# Altium PCB EMG-Arm-ELEC-V2.0.PcbDoc (part 4 of 5)
Units mil, origin at the board's own origin, x right, y up, seen from the top; angles counter-clockwise.
Board outline 8303.83 x 7532.25 mil, 2 copper layers (Top Layer, Bottom Layer), stack 3.556 mil thick; 263 components, 174 nets, 696 pads, 313 vias.
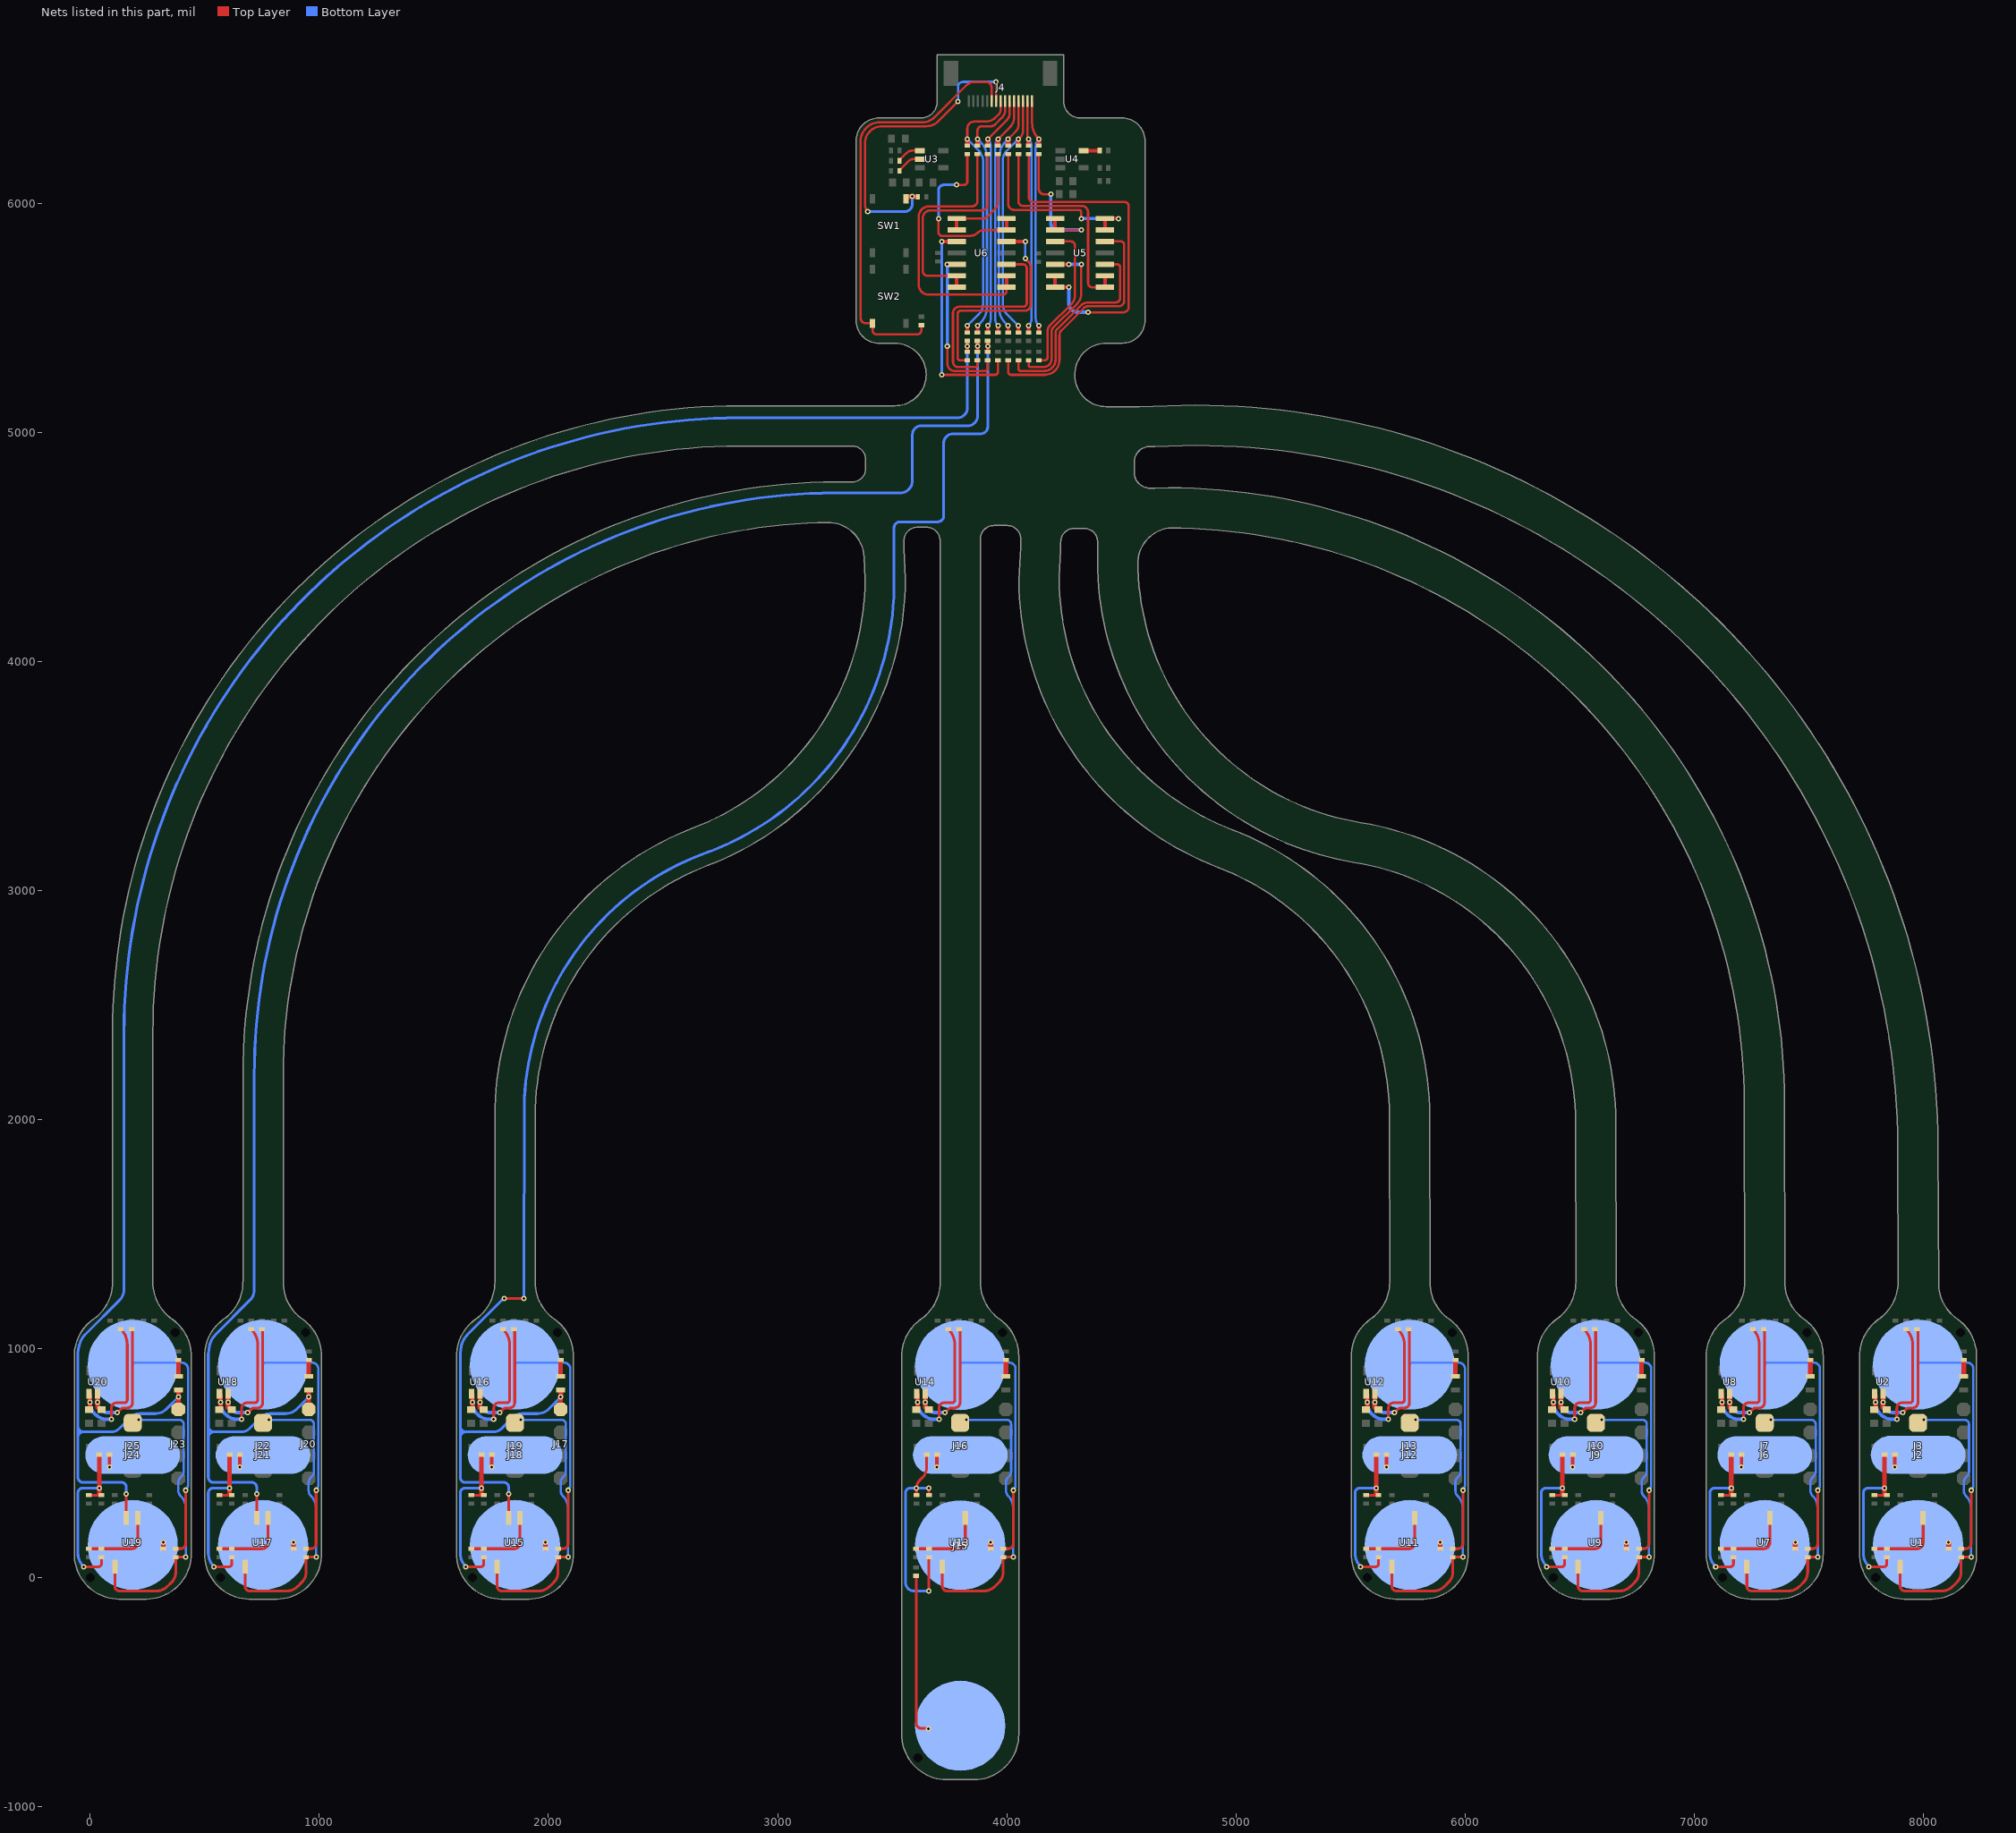
[diagram p3: the nets of this part, all layers, seen from the top]

## Via types
v1: diameter 23.62, hole 11.81, Top Layer to Bottom Layer, tented both sides, 313 vias

## Nets (pads, with @x,y where several pads share a name; then routed paths per layer and width w, separated by ;. In a path a pad name is that pad's centre, name@x,y a point inside that pad or via, vN(x,y) a via of type N, cw(c..) or ccw(c..) an arc to the next point about the centre after c; other vN are vias at no path point) (continued)
Measure6: J17.1 LED6.1 SB6.1 SB25.1 U15.7 | length 7222.4
  Top Layer w12: v1@1803.14,1218.15 v1(1806,1218.15) v1(1893.07,1218.15) ; U15.7@1825.8,259.35 v1(1825.8,365.14) ; J17.1@2052.95,733.06 J17.1@2053.28,733.38 ; LED6.1@2052.96,818.52 LED6.1@2053.61,817.87 ; v1@2053.28,788.06 v1(2053.61,788.39)
  Top Layer w15: SB25.1@3917.35,5351.05 v1(3917.35,5375.05) SB6.1@3917.35,5399.05
  Top Layer w20: J17.1@2053.28,733.38 v1@2053.28,788.06 ; v1(2053.61,788.39) LED6.1@2053.61,817.87
  Bottom Layer w12: 1619.24,635.65 1637.12,635.65 ; 1649.61,1063.73 ccw(c1735.53,977.86) 1627.27,1032.95 ccw(c1735.53,977.86) 1626.93,1032.27 1621.9,1018.41 1616.99,997.3 1614.77,976.87 1614.77,660.12 ; 1649.64,1063.75 v1@1805.02,1219.14 ; 1793.65,649.24 cw(c1760.8,682.15) 1760.8,635.65 1637.12,635.65 ; 1793.68,649.27 1842.73,698.32 cw(c1883.45,657.6) 1883.45,715.19 1908.44,715.19 1952.23,715.19 1952.3,715.19 ccw(c1952.24,783.2) 2000.36,735.14 v1(2053.61,788.39) ; v1(1825.8,365.14) 1825.8,394.68 ccw(c1805.71,394.68) 1805.71,414.77 1637.33,414.77 cw(c1637.33,437.33) 1614.77,437.33 1614.77,610.98 ; v1(1893.07,1218.15) 1893.07,1336.76 1893.82,2015.83 cw(c3098.17,2031.47) 2705.5,3170.11 ; 2705.5,3170.11 ccw(c2257.62,4337.95) 3508.28,4354.96 3508.28,4582.98 cw(c3534.14,4582.98) 3534.14,4608.84 3698.86,4608.84 ccw(c3698.86,4635.08) 3725.1,4635.08 3725.1,4952.9 cw(c3765.25,4952.9) 3765.25,4993.05 3886,4993.05 ccw(c3886,5024.39) 3917.35,5024.39 v1(3917.35,5375.05) ; 1614.77,610.98 cw(c1639.34,610.98) 1639.34,635.55 cw(c1639.34,660.12) 1637.12,635.65 ; 1614.77,610.98 1614.77,660.12 ; 1614.77,660.12 ccw(c1639.34,660.12) 1637.12,635.65
Measure7: J20.1 LED7.1 SB7.1 SB26.1 U17.7 | length 8094.8
  Top Layer w12: U17.7@726.01,259.35 v1(726.01,365.14) ; J20.1@953.17,733.06 J20.1@953.5,733.38 ; LED7.1@953.17,818.52 LED7.1@953.83,817.87 ; v1@953.5,788.06 v1(953.83,788.39)
  Top Layer w15: SB26.1@3872.74,5351.05 v1(3872.74,5375.05) SB7.1@3872.74,5399.05
  Top Layer w20: J20.1@953.5,733.38 v1@953.5,788.06 ; v1(953.83,788.39) LED7.1@953.83,817.87
  Bottom Layer w12: 519.45,635.65 537.34,635.65 ; 693.87,649.24 cw(c661.01,682.15) 661.01,635.65 537.34,635.65 ; 693.89,649.27 742.95,698.32 ; v1(726.01,365.14) 726.01,394.68 ccw(c705.93,394.68) 705.93,414.77 537.55,414.77 cw(c537.55,437.33) 514.98,437.33 514.98,610.98 ; 742.98,698.35 cw(c783.67,657.6) 783.67,715.19 808.66,715.19 852.45,715.19 852.52,715.19 ccw(c852.45,783.2) 900.58,735.14 v1(953.83,788.39) ; v1(3872.74,5375.05) 3872.74,5071.49 cw(c3829.02,5071.49) 3829.02,5027.78 3626.06,5027.78 ccw(c3626.06,4990.23) 3588.51,4990.23 3588.51,4789.01 cw(c3534.43,4789.01) 3534.43,4734.94 3249.14,4734.94 ccw(c3252.93,2197.73) 715.73,2193.94 715.73,1256.49 cw(c650.88,1256.49) 696.73,1210.63 549.85,1063.75 ccw(c635.75,977.86) 527.48,1032.95 ccw(c635.75,977.86) 527.14,1032.27 522.11,1018.41 517.21,997.3 514.98,976.87 514.98,660.12 ; 514.98,610.98 cw(c539.55,610.98) 539.55,635.55 cw(c539.55,660.12) 537.34,635.65 ; 514.98,610.98 514.98,660.12 ; 514.98,660.12 ccw(c539.55,660.12) 537.34,635.65
Measure8: J23.1 LED8.1 SB8.1 SB27.1 U19.7 | length 8594.9
  Top Layer w12: U19.7@157.04,259.35 v1(157.04,365.14) ; J23.1@384.2,733.06 J23.1@384.52,733.38 ; LED8.1@384.2,818.52 LED8.1@384.85,817.87 ; v1@384.52,788.06 v1(384.85,788.39)
  Top Layer w15: SB27.1@3828.13,5351.05 v1(3828.13,5375.05) SB8.1@3828.13,5399.05
  Top Layer w20: J23.1@384.52,733.38 v1@384.52,788.06 ; v1(384.85,788.39) LED8.1@384.85,817.87
  Bottom Layer w12: -49.52,635.65 -31.64,635.65 ; 124.89,649.24 cw(c92.04,682.15) 92.04,635.65 -31.64,635.65 ; 124.92,649.27 173.97,698.32 ; v1(157.04,365.14) 157.04,394.68 ccw(c136.95,394.68) 136.95,414.77 -31.43,414.77 cw(c-31.43,437.33) -53.99,437.33 -53.99,610.98 ; 174.01,698.35 cw(c214.69,657.6) 214.69,715.19 239.68,715.19 283.47,715.19 283.54,715.19 ccw(c283.48,783.2) 331.6,735.14 v1(384.85,788.39) ; v1(3828.13,5375.05) 3828.13,5105.91 cw(c3785.16,5105.91) 3785.16,5062.94 2834.14,5062.94 ccw(c2832.63,2377.32) 147.02,2378.83 147.02,1257.13 cw(c81.26,1257.13) 130.71,1213.79 cw(c81.26,1257.13) 127.92,1210.8 cw(c81.26,1257.13) 127.76,1210.63 -19.12,1063.75 ccw(c66.77,977.86) -41.49,1032.95 ccw(c66.77,977.86) -41.83,1032.27 -46.86,1018.41 -51.77,997.3 -53.99,976.87 -53.99,660.12 ; -53.99,610.98 cw(c-29.42,610.98) -29.42,635.55 cw(c-29.42,660.12) -31.64,635.65 ; -53.99,610.98 -53.99,660.12 ; -53.99,660.12 ccw(c-29.42,660.12) -31.64,635.65
MID1: J3.3 SB105.1 U1.1 | length 1345.7
  Top Layer w12: U1.1@7900.38,46.75 7900.38,-39.36 ccw(c7919.77,-39.36) 7919.77,-58.75 8083.09,-58.75 ccw(c8083.09,7.14) 8129.66,-39.48 ; J3.3@7978.35,675 ccw(c7980.29,675) J3.3@7980.29,673.05 ; 8129.69,-39.45 8147.87,-21.26 ccw(c8103.97,22.64) 8166.06,22.64 SB105.1@8166.06,88.17 8166.78,88.89 8209.28,88.89 v1(8210,89.61)
  Top Layer w20: J3.3@7980.29,673.05 8004.15,673.05 J3.3@8004.3,672.89
  Bottom Layer w10: v1@8004.46,688.05 8181.85,688.05 cw(c8181.85,669.26) 8200.63,669.26 8200.63,460.42 cw(c8176.65,460.42) 8193.61,443.47 8186.92,436.78 ccw(c8209.58,414.13) 8177.54,414.13 8177.54,380.09 8177.54,380.02 ccw(c8212.46,380.02) 8187.77,355.33 8187.81,355.29 8193.61,349.49 cw(c8125.95,299.63) 8210,299.63 v1(8210,89.61)
  other v1: 8004.3,687.89
MID2: J7.3 SB205.1 U7.1 | length 1345.7
  Top Layer w12: U7.1@7230.91,46.75 7230.91,-39.36 ccw(c7250.3,-39.36) 7250.3,-58.75 7413.62,-58.75 ccw(c7413.62,7.14) 7460.18,-39.48 7478.4,-21.26 ccw(c7434.49,22.64) 7496.59,22.64 SB205.1@7496.59,88.17 7497.31,88.89 7539.8,88.89 v1(7540.52,89.61) ; J7.3@7308.87,675 ccw(c7310.82,675) J7.3@7310.82,673.05
  Top Layer w20: J7.3@7310.82,673.05 7334.67,673.05 J7.3@7334.83,672.89
  Bottom Layer w10: v1@7334.99,688.05 7512.37,688.05 cw(c7512.37,669.26) 7531.16,669.26 7531.16,460.43 cw(c7507.18,460.43) 7524.14,443.47 7517.45,436.78 ccw(c7540.11,414.13) 7508.07,414.13 7508.07,380.1 7508.07,380.03 ccw(c7542.98,380.03) 7518.29,355.33 7518.34,355.29 7524.14,349.49 cw(c7456.47,299.63) 7540.52,299.63 v1(7540.52,89.61)
  other v1: 7334.83,687.89
MID3: J10.3 SB305.1 U9.1 | length 1345.7
  Top Layer w12: U9.1@6494.16,46.75 6494.16,-39.36 ccw(c6513.55,-39.36) 6513.55,-58.76 6676.87,-58.76 ccw(c6676.87,7.14) 6723.43,-39.49 ; J10.3@6572.12,675 ccw(c6574.07,674.99) J10.3@6574.07,673.04 ; 6723.46,-39.46 6741.65,-21.27 ccw(c6697.75,22.64) 6759.84,22.64 SB305.1@6759.84,88.16 6760.56,88.89 6803.05,88.89 v1(6803.78,89.61)
  Top Layer w20: J10.3@6574.07,673.04 6597.92,673.04 J10.3@6598.08,672.89
  Bottom Layer w10: v1@6598.24,688.04 6775.62,688.04 cw(c6775.62,669.26) 6794.41,669.26 6794.41,460.42 cw(c6770.43,460.42) 6787.39,443.46 6780.7,436.78 ccw(c6803.36,414.12) 6771.32,414.12 6771.32,380.09 6771.32,380.02 ccw(c6806.23,380.02) 6781.54,355.33 6781.59,355.28 6787.39,349.48 cw(c6719.73,299.62) 6803.78,299.62 v1(6803.78,89.61)
  other v1: 6598.08,687.89
MID4: J13.3 SB405.1 U11.1 | length 1345.7
  Top Layer w12: U11.1@5681.44,46.75 5681.44,-39.36 ccw(c5700.84,-39.36) 5700.84,-58.75 5864.16,-58.75 ccw(c5864.16,7.14) 5910.72,-39.48 ; J13.3@5759.41,675 ccw(c5761.36,675) J13.3@5761.36,673.05 ; 5910.75,-39.45 5928.94,-21.26 ccw(c5885.03,22.64) 5947.12,22.64 SB405.1@5947.12,88.17 5947.85,88.89 5990.34,88.89 v1(5991.06,89.61)
  Top Layer w20: J13.3@5761.36,673.05 5785.21,673.05 J13.3@5785.37,672.89
  Bottom Layer w10: v1@5785.52,688.05 5962.91,688.05 cw(c5962.91,669.26) 5981.7,669.26 5981.7,460.43 cw(c5957.72,460.43) 5974.67,443.47 5967.99,436.78 ; 5967.98,436.77 ccw(c5990.64,414.13) 5958.6,414.13 5958.6,380.09 5958.6,380.03 ccw(c5993.52,380.03) 5968.83,355.33 5968.88,355.29 5974.67,349.49 cw(c5907.01,299.63) 5991.06,299.63 v1(5991.06,89.61)
  other v1: 5785.37,687.89
MID5: J16.3 SB505.1 U13.1 | length 1345.7
  Top Layer w12: U13.1@3719.28,46.75 3719.28,-39.36 ccw(c3738.67,-39.36) 3738.67,-58.75 3901.99,-58.75 ccw(c3901.99,7.15) 3948.55,-39.48 ; J16.3@3797.25,675 ccw(c3799.19,675) J16.3@3799.19,673.05 ; 3948.59,-39.45 3966.77,-21.26 ccw(c3922.87,22.64) 3984.96,22.64 SB505.1@3984.96,88.17 3985.68,88.89 4028.18,88.89 v1(4028.9,89.61)
  Top Layer w20: J16.3@3799.19,673.05 3823.04,673.05 J16.3@3823.2,672.89
  Bottom Layer w10: v1@3823.36,688.05 4000.75,688.05 cw(c4000.75,669.26) 4019.53,669.26 4019.53,460.43 cw(c3995.55,460.43) 4012.51,443.47 4005.82,436.78 ccw(c4028.48,414.13) 3996.44,414.13 3996.44,380.1 3996.44,380.03 ccw(c4031.36,380.03) 4006.67,355.33 4006.71,355.29 4012.51,349.49 cw(c3944.85,299.63) 4028.9,299.63 v1(4028.9,89.61)
  other v1: 3823.2,687.89
MID6: J19.3 SB605.1 U15.1 | length 1345.7
  Top Layer w12: U15.1@1775.8,46.75 1775.8,-39.36 ccw(c1795.19,-39.36) 1795.19,-58.75 1958.51,-58.75 ccw(c1958.51,7.14) 2005.07,-39.48 ; J19.3@1853.76,675 ccw(c1855.71,675) J19.3@1855.71,673.05 ; 2005.1,-39.45 2023.29,-21.26 ccw(c1979.38,22.64) 2041.48,22.64 SB605.1@2041.48,88.17 2042.2,88.89 2084.69,88.89 v1(2085.41,89.61)
  Top Layer w20: J19.3@1855.71,673.05 1879.56,673.05 J19.3@1879.72,672.89
  Bottom Layer w10: v1@1879.88,688.05 2057.26,688.05 cw(c2057.26,669.26) 2076.05,669.26 2076.05,460.42 cw(c2052.07,460.42) 2069.03,443.47 2062.34,436.78 ccw(c2084.99,414.13) 2052.95,414.13 2052.95,380.09 2052.95,380.03 ccw(c2087.87,380.02) 2063.18,355.33 2063.23,355.29 2069.03,349.49 cw(c2001.36,299.63) 2085.41,299.63 v1(2085.41,89.61)
  other v1: 1879.72,687.89
MID7: J22.3 SB705.1 U17.1 | length 1345.7
  Top Layer w12: U17.1@676.01,46.75 676.01,-39.36 ccw(c695.4,-39.36) 695.4,-58.75 858.73,-58.75 ccw(c858.73,7.14) 905.29,-39.48 923.51,-21.26 ccw(c879.6,22.64) 941.69,22.64 SB705.1@941.69,88.17 942.41,88.89 984.91,88.89 v1(985.63,89.61) ; J22.3@753.98,675 ccw(c755.93,675) J22.3@755.93,673.05
  Top Layer w20: J22.3@755.93,673.05 779.78,673.05 J22.3@779.93,672.89
  Bottom Layer w10: v1@780.09,688.05 957.48,688.05 cw(c957.48,669.26) 976.27,669.26 976.27,460.43 cw(c952.28,460.43) 969.24,443.47 962.56,436.78 ccw(c985.21,414.13) 953.17,414.13 953.17,380.09 953.17,380.03 ccw(c988.09,380.03) 963.4,355.33 963.45,355.29 969.24,349.49 cw(c901.58,299.63) 985.63,299.63 v1(985.63,89.61)
  other v1: 779.93,687.89
MID8: J25.3 SB805.1 U19.1 | length 1345.7
  Top Layer w12: U19.1@107.04,46.75 107.04,-39.36 ccw(c126.43,-39.36) 126.43,-58.75 289.75,-58.75 ccw(c289.75,7.14) 336.31,-39.48 ; J25.3@185,675 ccw(c186.95,675) J25.3@186.95,673.05 ; 336.34,-39.45 354.53,-21.26 ccw(c310.62,22.64) 372.72,22.64 SB805.1@372.72,88.17 373.44,88.89 415.93,88.89 v1(416.65,89.61)
  Top Layer w20: J25.3@186.95,673.05 210.8,673.05 J25.3@210.96,672.89
  Bottom Layer w10: v1@211.12,688.05 388.5,688.05 cw(c388.5,669.26) 407.29,669.26 407.29,460.42 cw(c383.31,460.42) 400.27,443.47 393.58,436.78 ccw(c416.24,414.13) 384.2,414.13 384.2,380.09 384.2,380.03 ccw(c419.11,380.02) 394.42,355.33 394.47,355.29 400.27,349.49 cw(c332.6,299.63) 416.65,299.63 v1(416.65,89.61)
  other v1: 210.96,687.89
NetC3_2: C3.2 SB103.2 U2.2 | length 580.3
  Top Layer w12: v1(7911.14,720) 7926.69,734.71 cw(c7940.6,720) 7940.6,740.24 7954.69,740.24 ccw(c7954.69,762.83) 7977.28,762.83 7977.28,1081.42 7974.28,1084.42 SB103.2@7973.69,1084.42
  Top Layer w20: C3.2@7824.94,742.04 7824.94,764.77 v1(7825.38,765.22) U2.2@7825.38,800.83
  Bottom Layer w15: v1(7825.38,765.22) ccw(c7870.6,765.22) 7870.6,720 v1(7911.14,720)
NetC4_2: C4.2 SB104.1 U2.1 | length 678.7
  Top Layer w12: v1(7885.38,691.22) 7885.38,740.24 cw(c7907.72,740.24) 7907.72,762.58 7942.69,762.58 ccw(c7942.69,774.58) 7954.69,774.58 7954.69,1016.59 ccw(c7858.76,1016.59) SB104.1@7926.59,1084.42
  Top Layer w20: C4.2@7787.38,733.05 C4.2@7791.54,737.21 ; U2.1@7787.98,801.87 U2.1@7789.79,800.06 ; U2.1@7789.79,790.22 U2.1@7789.79,800.06 ; v1@7791.54,764.52 v1(7792.23,765.22) ; C4.2@7792.23,732.82 v1(7792.23,765.22) ; U2.1@7789.79,800.06 7792.23,797.62 v1(7792.23,765.22)
  Bottom Layer w15: v1(7792.23,765.22) ccw(c7866.82,765.22) 7866.82,690.63 7866.93,690.63 ccw(c7866.71,705.63) 7867.08,690.63 7885.38,691.08 v1(7885.38,691.22)
NetC13_2: C13.2 SB203.2 U8.2 | length 580.3
  Top Layer w12: v1(7241.66,720) 7257.22,734.71 cw(c7271.13,720) 7271.13,740.24 7285.21,740.24 ccw(c7285.21,762.83) 7307.8,762.83 7307.8,1081.42 7304.8,1084.42 SB203.2@7304.21,1084.42
  Top Layer w20: C13.2@7155.46,742.04 7155.46,764.77 v1(7155.91,765.22) U8.2@7155.91,800.83
  Bottom Layer w15: v1(7155.91,765.22) ccw(c7201.13,765.22) 7201.13,720 v1(7241.66,720)
NetC14_2: C14.2 SB204.1 U8.1 | length 678.7
  Top Layer w12: v1(7215.91,691.23) 7215.91,740.24 cw(c7238.25,740.24) 7238.25,762.59 7273.21,762.59 ccw(c7273.21,774.59) 7285.21,774.59 7285.21,1016.59 ccw(c7189.28,1016.59) SB204.1@7257.11,1084.42
  Top Layer w20: C14.2@7117.91,733.05 C14.2@7122.06,737.21 ; U8.1@7118.51,801.87 U8.1@7120.32,800.06 ; U8.1@7120.32,790.22 U8.1@7120.32,800.06 ; v1@7122.06,764.53 v1(7122.76,765.22) ; C14.2@7122.76,732.82 v1(7122.76,765.22) ; U8.1@7120.32,800.06 7122.76,797.62 v1(7122.76,765.22)
  Bottom Layer w15: v1(7122.76,765.22) ccw(c7197.35,765.22) 7197.35,690.63 7197.45,690.63 ccw(c7197.24,705.63) 7197.6,690.63 7215.91,691.08 v1(7215.91,691.23)
NetC18_2: C18.2 SB303.2 U10.2 | length 580.3
  Top Layer w12: v1(6504.91,719.99) 6520.47,734.7 cw(c6534.38,719.99) 6534.38,740.24 6548.46,740.24 ccw(c6548.46,762.83) 6571.05,762.83 6571.05,1081.41 6568.05,1084.41 SB303.2@6567.46,1084.41
  Top Layer w20: C18.2@6418.71,742.04 6418.71,764.77 v1(6419.16,765.21) U10.2@6419.16,800.82
  Bottom Layer w15: v1(6419.16,765.21) ccw(c6464.38,765.21) 6464.38,719.99 v1(6504.91,719.99)
NetC19_2: C19.2 SB304.1 U10.1 | length 678.7
  Top Layer w12: v1(6479.16,691.22) 6479.16,740.24 cw(c6501.5,740.24) 6501.5,762.58 6536.46,762.58 ccw(c6536.46,774.58) 6548.46,774.58 6548.46,1016.58 ccw(c6452.53,1016.58) SB304.1@6520.37,1084.41
  Top Layer w20: C19.2@6381.16,733.04 C19.2@6385.31,737.2 ; U10.1@6381.76,801.86 U10.1@6383.57,800.05 ; U10.1@6383.57,790.21 U10.1@6383.57,800.05 ; v1@6385.31,764.52 v1(6386.01,765.21) ; C19.2@6386.01,732.81 v1(6386.01,765.21) ; U10.1@6383.57,800.05 6386.01,797.61 v1(6386.01,765.21)
  Bottom Layer w15: v1(6386.01,765.21) ccw(c6460.6,765.21) 6460.6,690.62 6460.71,690.62 ccw(c6460.49,705.62) 6460.85,690.63 6479.16,691.07 v1(6479.16,691.22)
NetC23_2: C23.2 SB403.2 U12.2 | length 580.3
  Top Layer w12: v1(5692.2,720) 5707.75,734.71 cw(c5721.66,720) 5721.66,740.24 5735.75,740.24 ccw(c5735.75,762.83) 5758.34,762.83 5758.34,1081.42 5755.34,1084.42 SB403.2@5754.75,1084.42
  Top Layer w20: C23.2@5606,742.04 5606,764.77 v1(5606.45,765.22) U12.2@5606.45,800.83
  Bottom Layer w15: v1(5606.45,765.22) ccw(c5651.66,765.22) 5651.66,720 v1(5692.2,720)
NetC24_2: C24.2 SB404.1 U12.1 | length 678.7
  Top Layer w12: v1(5666.45,691.22) 5666.45,740.24 cw(c5688.79,740.24) 5688.79,762.59 5723.75,762.59 ccw(c5723.75,774.59) 5735.75,774.59 5735.75,1016.59 ccw(c5639.82,1016.59) SB404.1@5707.65,1084.42
  Top Layer w20: C24.2@5568.45,733.05 C24.2@5572.6,737.21 ; U12.1@5569.04,801.87 U12.1@5570.85,800.06 ; U12.1@5570.85,790.22 U12.1@5570.85,800.06 ; v1@5572.6,764.52 v1(5573.29,765.22) ; C24.2@5573.29,732.82 v1(5573.29,765.22) ; U12.1@5570.85,800.06 5573.29,797.62 v1(5573.29,765.22)
  Bottom Layer w15: v1(5573.29,765.22) ccw(c5647.88,765.22) 5647.88,690.63 5647.99,690.63 ccw(c5647.77,705.63) 5648.14,690.63 5666.45,691.08 v1(5666.45,691.22)
NetC28_2: C28.2 SB503.2 U14.2 | length 580.3
  Top Layer w12: v1(3730.04,720) 3745.59,734.71 cw(c3759.5,720) 3759.5,740.24 3773.59,740.24 ccw(c3773.59,762.83) 3796.17,762.83 3796.17,1081.42 3793.17,1084.42 SB503.2@3792.59,1084.42
  Top Layer w20: C28.2@3643.83,742.04 3643.83,764.77 v1(3644.28,765.22) U14.2@3644.28,800.83
  Bottom Layer w15: v1(3644.28,765.22) ccw(c3689.5,765.22) 3689.5,720 v1(3730.04,720)
NetC29_2: C29.2 SB504.1 U14.1 | length 678.7
  Top Layer w12: v1(3704.28,691.23) 3704.28,740.24 cw(c3726.62,740.24) 3726.62,762.59 3761.59,762.59 ccw(c3761.59,774.59) 3773.59,774.59 3773.59,1016.59 ccw(c3677.66,1016.59) SB504.1@3745.49,1084.42
  Top Layer w20: C29.2@3606.28,733.05 C29.2@3610.44,737.21 ; U14.1@3606.88,801.87 U14.1@3608.69,800.06 ; U14.1@3608.69,790.22 U14.1@3608.69,800.06 ; v1@3610.44,764.53 v1(3611.13,765.22) ; C29.2@3611.13,732.82 v1(3611.13,765.22) ; U14.1@3608.69,800.06 3611.13,797.62 v1(3611.13,765.22)
  Bottom Layer w15: v1(3611.13,765.22) ccw(c3685.72,765.22) 3685.72,690.63 3685.83,690.63 ccw(c3685.61,705.63) 3685.98,690.63 3704.28,691.08 v1(3704.28,691.23)
NetC33_2: C33.2 SB603.2 U16.2 | length 580.3
  Top Layer w12: v1(1786.55,720) 1802.11,734.71 cw(c1816.02,720) 1816.02,740.24 1830.1,740.24 ccw(c1830.1,762.83) 1852.69,762.83 1852.69,1081.42 1849.69,1084.42 SB603.2@1849.1,1084.42
  Top Layer w20: C33.2@1700.35,742.04 1700.35,764.77 v1(1700.8,765.22) U16.2@1700.8,800.83
  Bottom Layer w15: v1(1700.8,765.22) ccw(c1746.02,765.22) 1746.02,720 v1(1786.55,720)
NetC34_2: C34.2 SB604.1 U16.1 | length 678.7
  Top Layer w12: v1(1760.8,691.22) 1760.8,740.24 cw(c1783.14,740.24) 1783.14,762.58 1818.1,762.58 ccw(c1818.1,774.59) 1830.1,774.59 1830.1,1016.59 ccw(c1734.17,1016.59) SB604.1@1802,1084.42
  Top Layer w20: C34.2@1662.8,733.05 C34.2@1666.95,737.21 ; U16.1@1663.39,801.87 U16.1@1665.21,800.06 ; U16.1@1665.21,790.22 U16.1@1665.21,800.06 ; v1@1666.95,764.52 v1(1667.65,765.22) ; C34.2@1667.65,732.82 v1(1667.65,765.22) ; U16.1@1665.21,800.06 1667.65,797.62 v1(1667.65,765.22)
  Bottom Layer w15: v1(1667.65,765.22) ccw(c1742.24,765.22) 1742.24,690.63 1742.34,690.63 ccw(c1742.13,705.63) 1742.49,690.63 1760.8,691.08 v1(1760.8,691.22)
NetC38_2: C38.2 SB703.2 U18.2 | length 580.3
  Top Layer w12: v1(686.77,720) 702.32,734.71 cw(c716.23,720) 716.23,740.24 730.32,740.24 ccw(c730.32,762.83) 752.91,762.83 752.91,1081.42 749.91,1084.42 SB703.2@749.32,1084.42
  Top Layer w20: C38.2@600.57,742.04 600.57,764.77 v1(601.01,765.22) U18.2@601.01,800.83
  Bottom Layer w15: v1(601.01,765.22) ccw(c646.23,765.22) 646.23,720 v1(686.77,720)
NetC39_2: C39.2 SB704.1 U18.1 | length 678.7
  Top Layer w12: v1(661.01,691.22) 661.01,740.24 cw(c683.36,740.24) 683.36,762.59 718.32,762.59 ccw(c718.32,774.59) 730.32,774.59 730.32,1016.59 ccw(c634.39,1016.59) SB704.1@702.22,1084.42
  Top Layer w20: C39.2@563.01,733.05 C39.2@567.17,737.21 ; U18.1@563.61,801.87 U18.1@565.42,800.06 ; U18.1@565.42,790.22 U18.1@565.42,800.06 ; v1@567.17,764.52 v1(567.86,765.22) ; C39.2@567.86,732.82 v1(567.86,765.22) ; U18.1@565.42,800.06 567.86,797.62 v1(567.86,765.22)
  Bottom Layer w15: v1(567.86,765.22) ccw(c642.45,765.22) 642.45,690.63 642.56,690.63 ccw(c642.34,705.63) 642.71,690.63 661.01,691.08 v1(661.01,691.22)
NetC43_2: C43.2 SB803.2 U20.2 | length 580.3
  Top Layer w12: v1(117.79,720) 133.35,734.71 cw(c147.26,720) 147.26,740.24 161.34,740.24 ccw(c161.34,762.83) 183.93,762.83 183.93,1081.42 180.93,1084.42 SB803.2@180.34,1084.42
  Top Layer w20: C43.2@31.59,742.04 31.59,764.77 v1(32.04,765.22) U20.2@32.04,800.83
  Bottom Layer w15: v1(32.04,765.22) ccw(c77.26,765.22) 77.26,720 v1(117.79,720)
NetC44_2: C44.2 SB804.1 U20.1 | length 678.7
  Top Layer w12: v1(92.04,691.22) 92.04,740.24 cw(c114.38,740.24) 114.38,762.58 149.34,762.58 ccw(c149.34,774.59) 161.34,774.59 161.34,1016.59 ccw(c65.41,1016.59) SB804.1@133.24,1084.42
  Top Layer w20: C44.2@-5.96,733.05 C44.2@-1.81,737.21 ; U20.1@-5.36,801.87 U20.1@-3.55,800.06 ; U20.1@-3.55,790.22 U20.1@-3.55,800.06 ; v1@-1.81,764.52 v1(-1.11,765.22) ; C44.2@-1.11,732.82 v1(-1.11,765.22) ; U20.1@-3.55,800.06 -1.11,797.62 v1(-1.11,765.22)
  Bottom Layer w15: v1(-1.11,765.22) ccw(c73.48,765.22) 73.48,690.63 73.58,690.63 ccw(c73.37,705.63) 73.73,690.63 92.04,691.08 v1(92.04,691.22)
NetJ2_1: J2.1 SB105.2 | length 1084.5
  Top Layer w12: SB105.2@8166.06,125.17 8187.5,125.17 ccw(c8187.5,147.67) 8210,147.67 v1(8210,381.05)
  Bottom Layer w10: J2.1@7978.35,928.19 cw(c7987.73,928.19) 7987.73,937.58 8192.96,937.58 cw(c8192.96,910.9) 8219.63,910.9 8219.63,404.31 cw(c8186.74,404.31) 8216.83,391.03 cw(c8186.74,404.31) v1(8210,381.05)
NetJ2_2: J2.2 SB106.2 | length 25.8
  Top Layer w20: SB106.2@8111.58,127.25 v1(8111.58,153.05)
NetJ2_3: J2.3 SB107.2 | length 56
  Top Layer w12: SB107.2@7877.05,536.5 SB107.2@7877.6,535.95
  Top Layer w15: v1(7876.74,481.13) 7876.9,481.29 7876.9,535.25 SB107.2@7877.6,535.95
NetJ6_1: J6.1 SB205.2 | length 1084.5
  Top Layer w12: SB205.2@7496.59,125.17 7518.03,125.17 ccw(c7518.03,147.67) 7540.52,147.67 v1(7540.52,381.05)
  Bottom Layer w10: J6.1@7308.87,928.2 cw(c7318.25,928.19) 7318.25,937.58 7523.49,937.58 cw(c7523.49,910.91) 7550.16,910.91 7550.16,404.31 cw(c7517.26,404.31) 7547.36,391.03 cw(c7517.26,404.31) v1(7540.52,381.05)
NetJ6_2: J6.2 SB206.2 | length 25.8
  Top Layer w20: SB206.2@7442.11,127.25 v1(7442.11,153.05)
NetJ6_3: J6.3 SB207.2 | length 56
  Top Layer w12: SB207.2@7207.58,536.5 SB207.2@7208.12,535.95
  Top Layer w15: v1(7207.26,481.13) 7207.42,481.29 7207.42,535.25 SB207.2@7208.12,535.95
NetJ9_1: J9.1 SB305.2 | length 1084.5
  Top Layer w12: SB305.2@6759.84,125.16 6781.28,125.16 ccw(c6781.28,147.66) 6803.78,147.66 v1(6803.78,381.04)
  Bottom Layer w10: J9.1@6572.12,928.19 cw(c6581.5,928.19) 6581.5,937.57 6786.74,937.57 cw(c6786.74,910.9) 6813.41,910.9 6813.41,404.31 cw(c6780.51,404.31) 6810.61,391.02 cw(c6780.51,404.31) v1(6803.78,381.04)
NetJ9_2: J9.2 SB306.2 | length 25.8
  Top Layer w20: SB306.2@6705.36,127.25 v1(6705.36,153.04)
NetJ9_3: J9.3 SB307.2 | length 56
  Top Layer w12: SB307.2@6470.83,536.5 SB307.2@6471.37,535.95
  Top Layer w15: v1(6470.51,481.12) 6470.67,481.28 6470.67,535.24 SB307.2@6471.37,535.95
NetJ12_1: J12.1 SB405.2 | length 1084.5
  Top Layer w12: SB405.2@5947.12,125.17 5968.56,125.17 ccw(c5968.56,147.67) 5991.06,147.67 v1(5991.06,381.05)
  Bottom Layer w10: J12.1@5759.41,928.2 cw(c5768.79,928.19) 5768.79,937.58 5974.03,937.58 cw(c5974.03,910.91) 6000.7,910.91 6000.7,404.31 cw(c5967.8,404.31) 5997.9,391.03 cw(c5967.8,404.31) v1(5991.06,381.05)
NetJ12_2: J12.2 SB406.2 | length 25.8
  Top Layer w20: SB406.2@5892.64,127.25 v1(5892.64,153.05)
NetJ12_3: J12.3 SB407.2 | length 56
  Top Layer w12: SB407.2@5658.12,536.5 SB407.2@5658.66,535.95
  Top Layer w15: v1(5657.8,481.13) 5657.96,481.29 5657.96,535.25 SB407.2@5658.66,535.95
NetJ15_1: J15.1 SB505.2 | length 1084.5
  Top Layer w12: SB505.2@3984.96,125.17 4006.4,125.17 ccw(c4006.4,147.67) 4028.9,147.67 v1(4028.9,381.05)
  Bottom Layer w10: J15.1@3797.24,928.19 cw(c3806.63,928.19) 3806.63,937.58 4011.86,937.58 cw(c4011.86,910.91) 4038.53,910.91 4038.53,404.31 cw(c4005.64,404.31) 4035.73,391.03 cw(c4005.64,404.31) v1(4028.9,381.05)
NetJ15_2: J15.2 SB506.2 | length 25.8
  Top Layer w20: SB506.2@3930.48,127.25 v1(3930.48,153.05)
NetJ15_3: J15.3 SB507.2 | length 709.9
  Top Layer w12: SB507.2@3605,7 3605,-636 ccw(c3628,-636) 3628,-659 3657.24,-659 cw(c3657.24,-660) v1(3658.24,-660)
NetJ15_4: J15.4 SB513.2 | length 56
  Top Layer w12: SB513.2@3695.95,536.5 SB513.2@3696.5,535.95
  Top Layer w15: v1(3695.64,481.13) 3695.79,481.29 3695.79,535.25 SB513.2@3696.5,535.95
NetJ18_1: J18.1 SB605.2 | length 1084.5
  Top Layer w12: SB605.2@2041.48,125.17 2062.92,125.17 ccw(c2062.92,147.67) 2085.41,147.67 v1(2085.41,381.05)
  Bottom Layer w10: J18.1@1853.76,928.2 cw(c1863.14,928.19) 1863.14,937.58 2068.38,937.58 cw(c2068.38,910.9) 2095.05,910.9 2095.05,404.31 cw(c2062.15,404.31) 2092.25,391.03 cw(c2062.15,404.31) v1(2085.41,381.05)
NetJ18_2: J18.2 SB606.2 | length 25.8
  Top Layer w20: SB606.2@1987,127.25 v1(1987,153.05)
NetJ18_3: J18.3 SB607.2 | length 56
  Top Layer w12: SB607.2@1752.47,536.5 SB607.2@1753.01,535.95
  Top Layer w15: v1(1752.15,481.13) 1752.31,481.29 1752.31,535.25 SB607.2@1753.01,535.95
NetJ21_1: J21.1 SB705.2 | length 1084.5
  Top Layer w12: SB705.2@941.69,125.17 963.13,125.17 ccw(c963.13,147.67) 985.63,147.67 v1(985.63,381.05)
  Bottom Layer w10: J21.1@753.98,928.2 cw(c763.36,928.19) 763.36,937.58 968.59,937.58 cw(c968.59,910.91) 995.27,910.91 995.27,404.31 cw(c962.37,404.31) 992.47,391.03 cw(c962.37,404.31) v1(985.63,381.05)
NetJ21_2: J21.2 SB706.2 | length 25.8
  Top Layer w20: SB706.2@887.21,127.25 v1(887.21,153.05)
NetJ21_3: J21.3 SB707.2 | length 56
  Top Layer w12: SB707.2@652.68,536.5 SB707.2@653.23,535.95
  Top Layer w15: v1(652.37,481.13) 652.53,481.29 652.53,535.25 SB707.2@653.23,535.95
NetJ24_1: J24.1 SB805.2 | length 1084.5
  Top Layer w12: SB805.2@372.72,125.17 394.16,125.17 ccw(c394.16,147.67) 416.65,147.67 v1(416.65,381.05)
  Bottom Layer w10: J24.1@185,928.2 cw(c194.38,928.19) 194.38,937.58 399.62,937.58 cw(c399.62,910.9) 426.29,910.9 426.29,404.31 cw(c393.39,404.31) 423.49,391.03 cw(c393.39,404.31) v1(416.65,381.05)
NetJ24_2: J24.2 SB806.2 | length 25.8
  Top Layer w20: SB806.2@318.24,127.25 v1(318.24,153.05)
NetJ24_3: J24.3 SB807.2 | length 56
  Top Layer w12: SB807.2@83.71,536.5 SB807.2@84.25,535.95
  Top Layer w15: v1(83.39,481.13) 83.55,481.29 83.55,535.25 SB807.2@84.25,535.95
NetLED1_2: LED1.2 R2.2 | length 67.5
  Top Layer w20: LED1.2@8178.02,879.51 R2.2@8178.02,947.02
NetLED2_2: LED2.2 R10.2 | length 67.5
  Top Layer w20: LED2.2@7508.55,879.51 R10.2@7508.55,947.02
NetLED3_2: LED3.2 R14.2 | length 67.5
  Top Layer w20: LED3.2@6771.8,879.5 R14.2@6771.8,947.02
NetLED4_2: LED4.2 R18.2 | length 67.5
  Top Layer w20: LED4.2@5959.09,879.51 R18.2@5959.09,947.02
NetLED5_2: LED5.2 R22.2 | length 67.5
  Top Layer w20: LED5.2@3996.92,879.51 R22.2@3996.92,947.02
NetLED6_2: LED6.2 R26.2 | length 67.5
  Top Layer w20: LED6.2@2053.44,879.51 R26.2@2053.44,947.02
NetLED7_2: LED7.2 R30.2 | length 67.5
  Top Layer w20: LED7.2@953.65,879.51 R30.2@953.65,947.02
NetLED8_2: LED8.2 R34.2 | length 67.5
  Top Layer w20: LED8.2@384.68,879.51 R34.2@384.68,947.02
NetSB9_2: SB9.2 U4.5 | length 68.8
  Top Layer w15: U4.5@4336.56,6229.7 SB9.2@4405.38,6229.7
NetSB10_2: SB10.2 U3.2 | length 111.2
  Top Layer w10: SB10.2@3531.89,6141.55 3531.89,6145.05 3535.89,6149.05 3536.81,6149.05 3572.81,6185.05 cw(c3590.32,6167.54) 3590.32,6192.3 U3.2@3621.1,6192.3
NetSB11_1: SB11.1 U3.1 | length 97.4
  Top Layer w10: SB11.1@3537.23,6193.43 3563.05,6219.25 ; 3563.06,6219.27 cw(c3588.28,6194.01) 3588.28,6229.7 U3.1@3621.1,6229.7
NetSB12_1: SB12.1 U5.1 U5.2 | length 657.4
  Top Layer w10: SB12.1@4140.38,6214.05 4140.38,6061.33 ccw(c4162.66,6061.33) 4143.98,6049.19 ccw(c4162.66,6061.33) 4150.52,6042.65 ccw(c4162.66,6061.33) 4162.66,6039.05 v1(4192.38,6039.05) ; U5.2@4211.36,5883.05 v1(4325.38,5883.05)
  Top Layer w15: U5.2@4211.36,5883.05 U5.1@4211.36,5933.05
  Bottom Layer w15: v1(4192.38,6039.05) 4192.38,5913.48 ccw(c4222.81,5913.48) 4222.81,5883.05 v1(4325.38,5883.05)
NetSB13_1: SB13.1 U5.6 U5.7 | length 1563.8
  Top Layer w10: SB13.1@4095.77,6214.05 4095.77,6027.48 ccw(c4118.14,6027.48) 4118.14,6005.11 4514.78,6005.11 cw(c4514.78,5987.37) 4525.11,6001.8 cw(c4514.78,5987.37) 4529.21,5997.7 cw(c4514.78,5987.37) 4532.53,5987.37 4532.53,5546.25 cw(c4510.33,5546.25) 4510.33,5524.05 v1(4355.38,5524.05)
  Top Layer w15: U5.6@4211.36,5683.05 U5.7@4211.36,5633.05 v1(4270.78,5633.05)
  Bottom Layer w15: v1(4270.78,5633.05) 4270.78,5562.28 ccw(c4309.01,5562.28) 4276.75,5541.77 ccw(c4309.01,5562.28) 4288.5,5530.02 ccw(c4309.01,5562.28) 4309.01,5524.05 v1(4355.38,5524.05)
NetSB14_1: SB14.1 U5.8 U5.9 | length 983.2
  Top Layer w10: SB14.1@4051.17,6216.58 4051.17,6008.88 ccw(c4071.94,6008.88) 4071.94,5988.11 4327.5,5988.11 cw(c4327.5,5960.23) 4333.91,5987.37 cw(c4327.5,5960.23) 4354.64,5966.64 cw(c4327.5,5960.23) 4355.38,5960.23 4355.38,5651.05 ccw(c4373.38,5651.05) 4373.38,5633.05 U5.8@4429.4,5633.05
  Top Layer w15: U5.8@4429.4,5633.05 U5.9@4429.4,5683.05
NetSB15_1: SB15.1 U5.13 U5.14 | length 856.9
  Top Layer w10: SB15.1@4006.56,6214.05 4006.56,5997.05 ccw(c4032.5,5997.05) 4032.5,5971.11 4314.5,5971.11 cw(c4314.5,5960.23) 4325.38,5960.23 v1(4325.38,5933.05)
  Top Layer w15: U5.13@4429.4,5883.05 U5.14@4429.4,5933.05 v1(4488.82,5933.05)
  Bottom Layer w15: v1(4325.38,5933.05) v1(4488.82,5933.05)
NetSB16_2: SB16.2 U5.3 | length 676.3
  Top Layer w10: SB16.2@4140.38,5314.05 4164.94,5314.05 ccw(c4164.94,5328.38) 4179.27,5328.38 4179.27,5445.47 cw(c4206.97,5445.47) 4187.36,5465.03 ; 4187.38,5465.05 4282.47,5560.14 ccw(c4245.85,5596.76) 4297.64,5596.76 4297.64,5815.93 ccw(c4280.53,5815.93) 4280.53,5833.05 U5.3@4211.36,5833.05
NetSB17_2: SB17.2 U5.5 | length 720.2
  Top Layer w10: SB17.2@4095.77,5314.05 4095.77,5292.93 ccw(c4103.9,5292.93) 4103.9,5284.81 4160.75,5284.81 ccw(c4160.75,5320.33) 4196.27,5320.33 4196.27,5439.94 cw(c4220.31,5439.94) 4203.3,5456.92 4306.51,5560.14 ccw(c4260.96,5605.69) 4325.38,5605.69 v1@4325.38,5730.27
  Top Layer w15: U5.5@4211.36,5733.05 v1(4270.78,5733.05)
  Bottom Layer w15: v1(4270.78,5733.05) v1(4325.38,5733.05)
NetSB18_2: SB18.2 U5.10 | length 907.1
  Top Layer w10: SB18.2@4051.17,5314.05 4051.17,5277.26 ccw(c4060.63,5277.26) 4060.63,5267.81 4163.51,5267.81 ccw(c4163.51,5317.57) 4213.27,5317.57 4213.27,5432.9 cw(c4237.31,5432.9) 4220.3,5449.88 4325.38,5554.97 4325.55,5555.13 cw(c4354.23,5525.77) 4354.23,5566.81 4475.23,5566.81 ccw(c4475.23,5587.24) 4495.66,5587.24 4495.66,5720.09 ccw(c4482.7,5720.09) 4482.7,5733.05 U5.10@4429.4,5733.05
NetSB19_2: SB19.2 U5.12 | length 1116.4
  Top Layer w10: SB19.2@4006.56,5314.05 4006.56,5263.36 ccw(c4019.11,5263.36) 4019.11,5250.81 4166.19,5250.81 ccw(c4166.19,5314.89) 4230.27,5314.89 4230.27,5422.75 cw(c4261.81,5422.75) 4239.48,5445.03 4337.23,5542.77 cw(c4354.23,5525.77) 4354.23,5549.81 4487.93,5549.81 ccw(c4487.93,5574.55) 4512.66,5574.55 4512.66,5819.56 ccw(c4499.17,5819.56) 4499.17,5833.05 U5.12@4429.4,5833.05
NetSB20_1: SB20.1 U6.1 U6.2 | length 476.5
  Top Layer w10: U6.1@3781.36,5933.05 3896.75,5933.05 ccw(c3896.75,5957.52) 3914.04,5940.2 ; 3914.06,5940.22 3949.54,5975.7 ccw(c3919.56,6005.68) 3961.95,6005.68 SB20.1@3961.95,6214.05
  Top Layer w15: U6.2@3781.36,5883.05 U6.1@3781.36,5933.05
NetSB21_1: SB21.1 U6.6 U6.7 | length 977
  Top Layer w10: U6.6@3781.36,5683.05 3655.77,5683.05 cw(c3655.77,5705.51) 3633.31,5705.51 3633.31,5934.54 cw(c3667.92,5934.54) 3667.92,5969.15 3890.38,5969.15 ccw(c3890.38,5996.12) 3907.02,5974.89 ccw(c3890.38,5996.12) 3911.61,5979.48 ccw(c3890.38,5996.12) 3917.35,5996.12 SB21.1@3917.35,6214.05
  Top Layer w15: U6.7@3781.36,5633.05 U6.6@3781.36,5683.05
NetSB22_1: SB22.1 U6.8 U6.9 | length 1279.8
  Top Layer w10: SB22.1@3872.74,6214.05 3872.74,6011.35 cw(c3847.54,6011.35) 3847.54,5986.15 3661.06,5986.15 ccw(c3661.06,5941.41) 3616.31,5941.41 3616.31,5644.09 ccw(c3659.34,5644.09) 3659.34,5601.07 3984.88,5601.07 ccw(c3984.88,5615.59) 3999.4,5615.59 U6.8@3999.4,5633.05
  Top Layer w15: U6.8@3999.4,5633.05 U6.9@3999.4,5683.05
NetSB23_1: SB23.1 U6.13 U6.14 | length 812.9
  Top Layer w10: v1(3702.81,5933.05) 3702.81,5871.75 ccw(c3716.65,5871.75) 3716.65,5857.91 3842.3,5857.91 ccw(c3842.3,5900.83) 3872.66,5870.48 cw(c3903.01,5840.13) 3903.01,5883.05 U6.13@3999.4,5883.05 ; v1(3780.38,6080.05) 3813.65,6080.05 ccw(c3813.65,6094.54) 3828.13,6094.54 SB23.1@3828.13,6214.05
  Top Layer w15: U6.13@3999.4,5883.05 U6.14@3999.4,5933.05
  Bottom Layer w12: v1(3702.81,5933.05) 3702.81,6057.48 cw(c3725.38,6057.48) 3725.38,6080.05 v1(3780.38,6080.05)
NetSB24_2: SB24.2 U6.3 | length 952.8
  Top Layer w10: v1(3716.38,5251.05) 3716.63,5250.81 3949.41,5250.81 ccw(c3949.41,5263.36) 3961.95,5263.36 SB24.2@3961.95,5314.05
  Top Layer w15: v1(3715.93,5833.05) U6.3@3781.36,5833.05
  Bottom Layer w10: v1(3715.93,5833.05) v1@3716.15,5832.82 ; v1@3716.15,5251.28 v1(3716.38,5251.05) ; v1@3721.95,5833.05 v1@3723.14,5831.86
  Bottom Layer w12: v1@3716.15,5251.28 v1@3716.15,5832.82
NetSB25_2: SB25.2 U6.5 | length 712.1
  Top Layer w10: v1(3741.05,5375.05) 3741.05,5299.96 ccw(c3773.2,5299.96) 3773.2,5267.81 3907.89,5267.81 ccw(c3907.89,5277.26) 3917.35,5277.26 SB25.2@3917.35,5314.05
  Top Layer w15: v1(3741.05,5733.05) U6.5@3781.36,5733.05
  Bottom Layer w12: v1@3741.05,5373.18 v1(3741.05,5733.05)
NetSB26_2: SB26.2 U6.10 | length 956.7
  Top Layer w10: SB26.2@3872.74,5314.05 3872.74,5292.93 cw(c3864.62,5292.93) 3864.62,5284.81 3787.46,5284.81 cw(c3787.46,5306.69) 3765.57,5306.69 3765.57,5520.78 cw(c3792.63,5520.78) 3792.63,5547.83 4071.67,5547.83 ccw(c4071.67,5563.83) 4087.66,5563.83 4087.66,5716.97 ccw(c4071.59,5716.97) 4071.59,5733.05 U6.10@3999.4,5733.05
NetSB27_2: SB27.2 U6.12 | length 948
  Top Layer w10: SB27.2@3828.13,5314.05 3796.96,5314.05 cw(c3796.96,5325.56) 3785.45,5325.56 3785.45,5516.61 cw(c3799.67,5516.61) 3799.67,5530.83 4078.71,5530.83 ccw(c4078.71,5556.79) 4104.66,5556.79 4104.66,5719.7 ccw(c4068.39,5719.7) 4094.04,5745.35 v1(4081.45,5757.95)
  Top Layer w15: U6.12@3999.4,5833.05 v1(4081.45,5833.05)
  Bottom Layer w10: v1(4081.45,5757.95) v1@4081.45,5832.2
NetSB101_2: SB101.2 SB102.2 U1.6 | length 336.5
  Top Layer w12: SB101.2@7787.36,125.17 SB102.2@7841.84,125.17 7975.38,125.17 ccw(c7975.38,150.17) 8000.38,150.17 U1.6@8000.38,259.35
NetSB201_2: SB201.2 SB202.2 U7.6 | length 336.5
  Top Layer w12: SB201.2@7117.88,125.17 SB202.2@7172.36,125.17 7305.91,125.17 ccw(c7305.91,150.17) 7330.91,150.17 U7.6@7330.91,259.35
NetSB301_2: SB301.2 SB302.2 U9.6 | length 336.5
  Top Layer w12: SB301.2@6381.13,125.16 SB302.2@6435.61,125.16 6569.16,125.16 ccw(c6569.16,150.16) 6594.16,150.16 U9.6@6594.16,259.34
NetSB401_2: SB401.2 SB402.2 U11.6 | length 336.5
  Top Layer w12: SB401.2@5568.42,125.17 SB402.2@5622.9,125.17 5756.45,125.17 ccw(c5756.45,150.17) 5781.45,150.17 U11.6@5781.44,259.35
NetSB501_2: SB501.2 SB502.2 U13.6 | length 336.5
  Top Layer w12: SB501.2@3606.26,125.17 SB502.2@3660.74,125.17 3794.28,125.17 ccw(c3794.28,150.17) 3819.28,150.17 U13.6@3819.28,259.35
NetSB601_2: SB601.2 SB602.2 U15.6 | length 336.5
  Top Layer w12: SB601.2@1662.77,125.17 SB602.2@1717.25,125.17 1850.8,125.17 ccw(c1850.8,150.17) 1875.8,150.17 U15.6@1875.8,259.35
NetSB701_2: SB701.2 SB702.2 U17.6 | length 336.5
  Top Layer w12: SB701.2@562.99,125.17 SB702.2@617.47,125.17 751.01,125.17 ccw(c751.01,150.17) 776.01,150.17 U17.6@776.01,259.35
NetSB801_2: SB801.2 SB802.2 U19.6 | length 336.5
  Top Layer w12: SB801.2@-5.99,125.17 SB802.2@48.49,125.17 182.04,125.17 ccw(c182.04,150.17) 207.04,150.17 U19.6@207.04,259.35
SENSOR1: J4.15 SB1.2 SB12.2 | length 1051.1
  Top Layer w10: J4.15@4111.03,6445.36 4111.03,6350.82 ccw(c4211.03,6350.82) 4140.32,6280.11 v1(4140.38,6280.05)
  Top Layer w15: SB1.2@4140.38,5436.05 v1(4140.38,5465.05)
  Top Layer w20: SB12.2@4140.38,6253.58 v1(4140.38,6280.05)
  Bottom Layer w10: v1@4140.35,5465.08 cw(c4173.96,5498.63) 4126.47,5498.63 4126.47,6246.47 cw(c4173.96,6246.47) v1@4140.35,6280.02
SENSOR2: J4.14 SB2.2 SB13.2 | length 1043.5
  Top Layer w10: J4.14@4091.35,6445.36 4091.35,6290.72 ccw(c4106.45,6290.72) v1(4095.77,6280.05)
  Top Layer w15: SB2.2@4095.77,5436.05 v1(4095.77,5465.05)
  Top Layer w20: SB13.2@4095.77,6253.58 v1(4095.77,6280.05)
  Bottom Layer w10: v1(4095.77,5465.05) ccw(c4066.16,5494.66) 4104.22,5477.18 ccw(c4066.16,5494.66) 4108.04,5494.66 4108.04,6250.44 ccw(c4066.16,6250.44) 4104.22,6267.92 ccw(c4066.16,6250.44) v1(4095.77,6280.05)
SENSOR3: J4.13 SB3.2 SB14.2 | length 1093.8
  Top Layer w10: v1(4051.17,6280.05) 4061.42,6290.3 ccw(c4036.68,6315.04) 4071.66,6315.04 J4.13@4071.66,6445.36
  Top Layer w15: SB3.2@4051.17,5436.05 v1(4051.17,5465.05)
  Top Layer w20: SB14.2@4051.17,6253.58 v1(4051.17,6280.05)
  Bottom Layer w10: 3983.54,6189.99 3983.54,5558.51 ccw(c4045.89,5558.51) 4001.8,5514.42 v1(4051.17,5465.05) ; 3983.54,6190.03 cw(c4037.58,6190.03) 3999.38,6228.26 ; 3999.38,6228.26 v1(4051.17,6280.05)
SENSOR4: J4.12 SB4.2 SB15.2 | length 1077.5
  Top Layer w10: v1(4006.56,6280.05) 4038.67,6312.16 ; 4038.7,6312.19 ccw(c4006.52,6344.3) 4051.98,6344.3 J4.12@4051.98,6445.36
  Top Layer w15: SB4.2@4006.56,5436.05 v1(4006.56,5465.05)
  Top Layer w20: SB15.2@4006.56,6253.58 v1(4006.56,6280.05)
  Bottom Layer w10: 3966.54,6198.64 3966.54,5543.4 3966.54,5543.34 ccw(c4058.91,5543.34) 3993.52,5478.09 v1(4006.56,5465.05) ; 3966.54,6198.69 cw(c4066.34,6198.69) 3995.77,6269.26 v1(4006.56,6280.05)
SENSOR5: J4.11 SB5.2 SB20.2 | length 1069
  Top Layer w10: v1(3961.95,6280.05) 4014.64,6332.74 ccw(c3972.02,6375.35) 4032.29,6375.35 J4.11@4032.29,6445.36
  Top Layer w15: SB5.2@3961.95,5436.05 v1(3961.95,5465.05)
  Top Layer w20: SB20.2@3961.95,6253.58 v1(3961.95,6280.05)
  Bottom Layer w10: v1(3961.95,5465.05) cw(c3991.94,5495.03) 3949.54,5495.03 3949.54,6250.07 cw(c3991.94,6250.07) v1(3961.95,6280.05)
SENSOR6: J4.10 SB6.2 SB21.2 | length 1081
  Top Layer w10: v1(3917.35,6280.05) 4001.76,6364.47 ccw(c3975.57,6390.66) 4012.61,6390.66 J4.10@4012.61,6445.36
  Top Layer w15: SB6.2@3917.35,5436.05 v1(3917.35,5465.05)
  Top Layer w20: SB21.2@3917.35,6253.58 v1(3917.35,6280.05)
  Bottom Layer w10: v1(3917.35,5465.05) ccw(c3884.25,5498.15) 3931.06,5498.15 3931.06,6246.95 ccw(c3884.25,6246.95) v1(3917.35,6280.05)
SENSOR7: J4.9 SB7.2 SB22.2 | length 1141
  Top Layer w10: v1(3872.74,6280.05) 3872.74,6317.16 cw(c3891.23,6317.21) 3878.41,6330.53 3878.92,6331.02 cw(c3891.82,6317.61) 3891.82,6336.22 3919.44,6336.22 3932.04,6336.22 ccw(c3932.04,6360.85) 3949.45,6343.43 3979.28,6373.26 ccw(c3946.33,6406.22) 3992.93,6406.22 J4.9@3992.93,6445.36
  Top Layer w15: SB7.2@3872.74,5436.05 v1(3872.74,5465.05)
  Top Layer w20: SB22.2@3872.74,6253.58 v1(3872.74,6280.05)
  Bottom Layer w10: v1(3872.74,5465.05) 3884.76,5477.07 ccw(c3814.04,5547.8) 3914.06,5547.8 ; v1(3872.74,6280.05) 3887.33,6265.46 cw(c3822.81,6200.93) 3914.06,6200.93 3914.06,6200.87 3914.06,5547.84
SENSOR8: J4.8 SB8.2 SB23.2 | length 1192
  Top Layer w10: v1(3828.13,6280.05) 3828.13,6326.23 cw(c3858.27,6326.23) 3858.27,6356.37 3907.83,6356.37 ccw(c3907.83,6418.77) 3951.95,6374.65 3964.22,6386.92 ccw(c3942.43,6408.71) 3973.23,6407.77 ccw(c3942.43,6408.71) 3973.24,6408.71 J4.8@3973.24,6445.36
  Top Layer w15: SB8.2@3828.13,5436.05 v1(3828.13,5465.05)
  Top Layer w20: SB23.2@3828.13,6253.58 v1(3828.13,6280.05)
  Bottom Layer w10: v1(3828.13,5465.05) 3877.5,5514.42 ccw(c3830.29,5561.63) 3877.54,5514.46 ccw(c3830.29,5561.63) 3897.06,5561.63 3897.06,6182.02 ccw(c3826.81,6182.02) 3876.52,6231.66 ; v1(3828.13,6280.05) 3876.48,6231.7 ; 3876.52,6231.66 ccw(c3826.81,6182.02) 3876.48,6231.7
SW1: J4.7 R7.1 SW1.3 | length 1416.7
  Top Layer w10: v1(3393.53,5964.05) cw(c3422.86,5993.38) 3381.38,5993.38 3381.38,6260.96 cw(c3456.89,6260.96) 3456.89,6336.46 3649.18,6336.46 ccw(c3649.18,6410.89) 3701.79,6358.24 v1(3787.37,6443.82) ; J4.7@3953.56,6445.36 v1(3953.56,6529.87)
  Top Layer w20: SW1.3@3560.11,6022.29 3560.11,6022.43 3566.92,6029.24 3585.48,6029.24 3586.48,6030.23 v1(3587.47,6029.24) 3588.5,6028.2 R7.1@3608.68,6028.2
  Bottom Layer w10: v1(3787.37,6443.82) 3787.37,6508.04 cw(c3809.2,6508.04) 3809.2,6529.87 v1(3953.56,6529.87)
  Bottom Layer w12: v1(3393.53,5964.05) 3556.84,5964.05 ccw(c3556.84,5994.67) 3587.47,5994.67 v1(3587.47,6029.24)
SW2: J4.6 R8.1 SW2.3 | length 1882.8
  Top Layer w10: R8.1@3627.42,5467.51 3627.42,5445.05 cw(c3610.42,5445.05) 3610.42,5428.05 3430.38,5428.05 cw(c3430.38,5443.99) 3414.44,5443.99 SW2.3@3414.44,5476.19 3385.49,5476.19 cw(c3385.49,5499.3) 3370.62,5481.62 cw(c3385.49,5499.3) 3367.81,5484.42 cw(c3385.49,5499.3) 3362.38,5499.3 3362.38,6269.3 cw(c3446.55,6269.3) 3446.55,6353.46 3633.46,6353.46 ccw(c3633.46,6423.79) 3683.17,6374.04 ; 3683.19,6374.06 3824.38,6515.25 ; 3824.41,6515.28 cw(c3857.41,6482.22) 3857.41,6528.94 3911.32,6528.94 cw(c3911.32,6506.38) 3933.87,6506.38 J4.6@3933.87,6445.36
VCC/2-1: R3.2 R4.1 SB102.1 SB108.2 | length 773.5
  Top Layer w12: v1(7763.88,46.75) 7829.34,46.75 ccw(c7829.34,59.25) 7841.84,59.25 SB102.1@7841.84,88.17 ; R4.1@7787.38,359.06 R3.2@7841.84,359.06
  Top Layer w20: R3.2@7832.22,363.3 v1(7832.22,389.95) SB108.2@7832.22,534.5
  Bottom Layer w12: v1(7763.88,46.75) cw(c7823.12,105.99) 7739.35,105.99 7739.35,130.91 7739.35,369.41 cw(c7759.89,369.41) 7759.89,389.95 v1(7832.22,389.95)
VCC/2-2: R11.2 R12.1 SB202.1 SB208.2 | length 773.5
  Top Layer w12: v1(7094.41,46.75) 7159.86,46.75 ccw(c7159.86,59.25) 7172.36,59.25 SB202.1@7172.36,88.17 ; R12.1@7117.91,359.06 R11.2@7172.36,359.06
  Top Layer w20: R11.2@7162.74,363.3 v1(7162.74,389.96) SB208.2@7162.74,534.5
  Bottom Layer w12: v1(7094.41,46.75) cw(c7153.65,105.99) 7069.87,105.99 7069.87,130.91 7069.87,369.41 cw(c7090.42,369.41) 7090.42,389.96 v1(7162.74,389.96)
VCC/2-3: R15.2 R16.1 SB302.1 SB308.2 | length 773.5
  Top Layer w12: v1(6357.66,46.75) 6423.11,46.75 ccw(c6423.11,59.25) 6435.61,59.25 SB302.1@6435.61,88.16 ; R16.1@6381.16,359.05 R15.2@6435.61,359.05
  Top Layer w20: R15.2@6425.99,363.29 v1(6425.99,389.95) SB308.2@6425.99,534.49
  Bottom Layer w12: v1(6357.66,46.75) cw(c6416.9,105.99) 6333.12,105.99 6333.12,130.9 6333.12,369.4 cw(c6353.67,369.4) 6353.67,389.95 v1(6425.99,389.95)
VCC/2-4: R19.2 R20.1 SB402.1 SB408.2 | length 773.5
  Top Layer w12: v1(5544.95,46.75) 5610.4,46.75 ccw(c5610.4,59.25) 5622.9,59.25 SB402.1@5622.9,88.17 ; R20.1@5568.45,359.06 R19.2@5622.9,359.06
  Top Layer w20: R19.2@5613.28,363.3 v1(5613.28,389.95) SB408.2@5613.28,534.5
  Bottom Layer w12: v1(5544.95,46.75) cw(c5604.19,105.99) 5520.41,105.99 5520.41,130.91 5520.41,369.41 cw(c5540.96,369.41) 5540.96,389.95 v1(5613.28,389.95)
VCC/2-5: R23.2 R24.1 SB502.1 SB508.2 | length 998.2
  Top Layer w12: R24.1@3606.28,359.06 v1(3606.26,389.96) cw(c3654.58,389.96) 3620.41,424.12 3633.52,437.23 ccw(c3591.04,479.71) 3651.12,479.71 SB508.2@3651.12,536.5 ; v1(3660.74,-58.75) SB502.1@3660.74,88.17 ; R23.2@3660.74,359.06 v1(3660.72,389.96)
  Bottom Layer w12: 3558.25,369.41 3558.25,294.16 3558.25,130.91 3558.25,-21.94 ccw(c3595.05,-21.94) 3595.05,-58.75 v1(3660.74,-58.75) ; 3558.25,369.45 cw(c3578.79,369.41) 3578.79,389.96 v1(3606.26,389.96) v1(3660.72,389.96)
VCC/2-6: R27.2 R28.1 SB602.1 SB608.2 | length 773.5
  Top Layer w12: v1(1639.3,46.75) 1704.75,46.75 ccw(c1704.75,59.25) 1717.25,59.25 SB602.1@1717.25,88.17 ; R28.1@1662.8,359.06 R27.2@1717.25,359.06
  Top Layer w20: R27.2@1707.63,363.3 v1(1707.63,389.95) SB608.2@1707.63,534.5
  Bottom Layer w12: v1(1639.3,46.75) cw(c1698.54,105.99) 1614.76,105.99 1614.76,130.91 1614.76,369.41 cw(c1635.31,369.41) 1635.31,389.95 v1(1707.63,389.95)
VCC/2-7: R31.2 R32.1 SB702.1 SB708.2 | length 773.5
  Top Layer w12: v1(539.52,46.75) 604.97,46.75 ccw(c604.97,59.25) 617.47,59.25 SB702.1@617.47,88.17 ; R32.1@563.01,359.06 R31.2@617.47,359.06
  Top Layer w20: R31.2@607.85,363.3 v1(607.85,389.95) SB708.2@607.85,534.5
  Bottom Layer w12: v1(539.52,46.75) cw(c598.76,105.99) 514.98,105.99 514.98,130.91 514.98,369.41 cw(c535.52,369.41) 535.52,389.95 v1(607.85,389.95)
VCC/2-8: R35.2 R36.1 SB802.1 SB808.2 | length 773.5
  Top Layer w12: v1(-29.46,46.75) 35.99,46.75 ccw(c35.99,59.25) 48.49,59.25 SB802.1@48.49,88.17 ; R36.1@-5.96,359.06 R35.2@48.49,359.06
  Top Layer w20: R35.2@38.87,363.3 v1(38.87,389.95) SB808.2@38.87,534.5
  Bottom Layer w12: v1(-29.46,46.75) cw(c29.78,105.99) -54,105.99 -54,130.91 -54,369.41 cw(c-33.45,369.41) -33.45,389.95 v1(38.87,389.95)